# Altium PCB integrating_box_light_source.PcbDoc
Units mm, origin at the board's own origin, x right, y up, seen from the top; angles counter-clockwise.
Board outline 152.4 x 101.6 mm, 18 copper layers (F.Cu, F.Mask, B.Cu, B.Mask, F.SilkS, B.SilkS, F.Adhes, B.Adhes, F.Paste, B.Paste, Dwgs.User, Cmts.User, Eco1.User, Eco2.User, Edge.Cuts, Margin, B.CrtYd, F.CrtYd); 78 components, 0 nets, 246 pads, 0 vias.
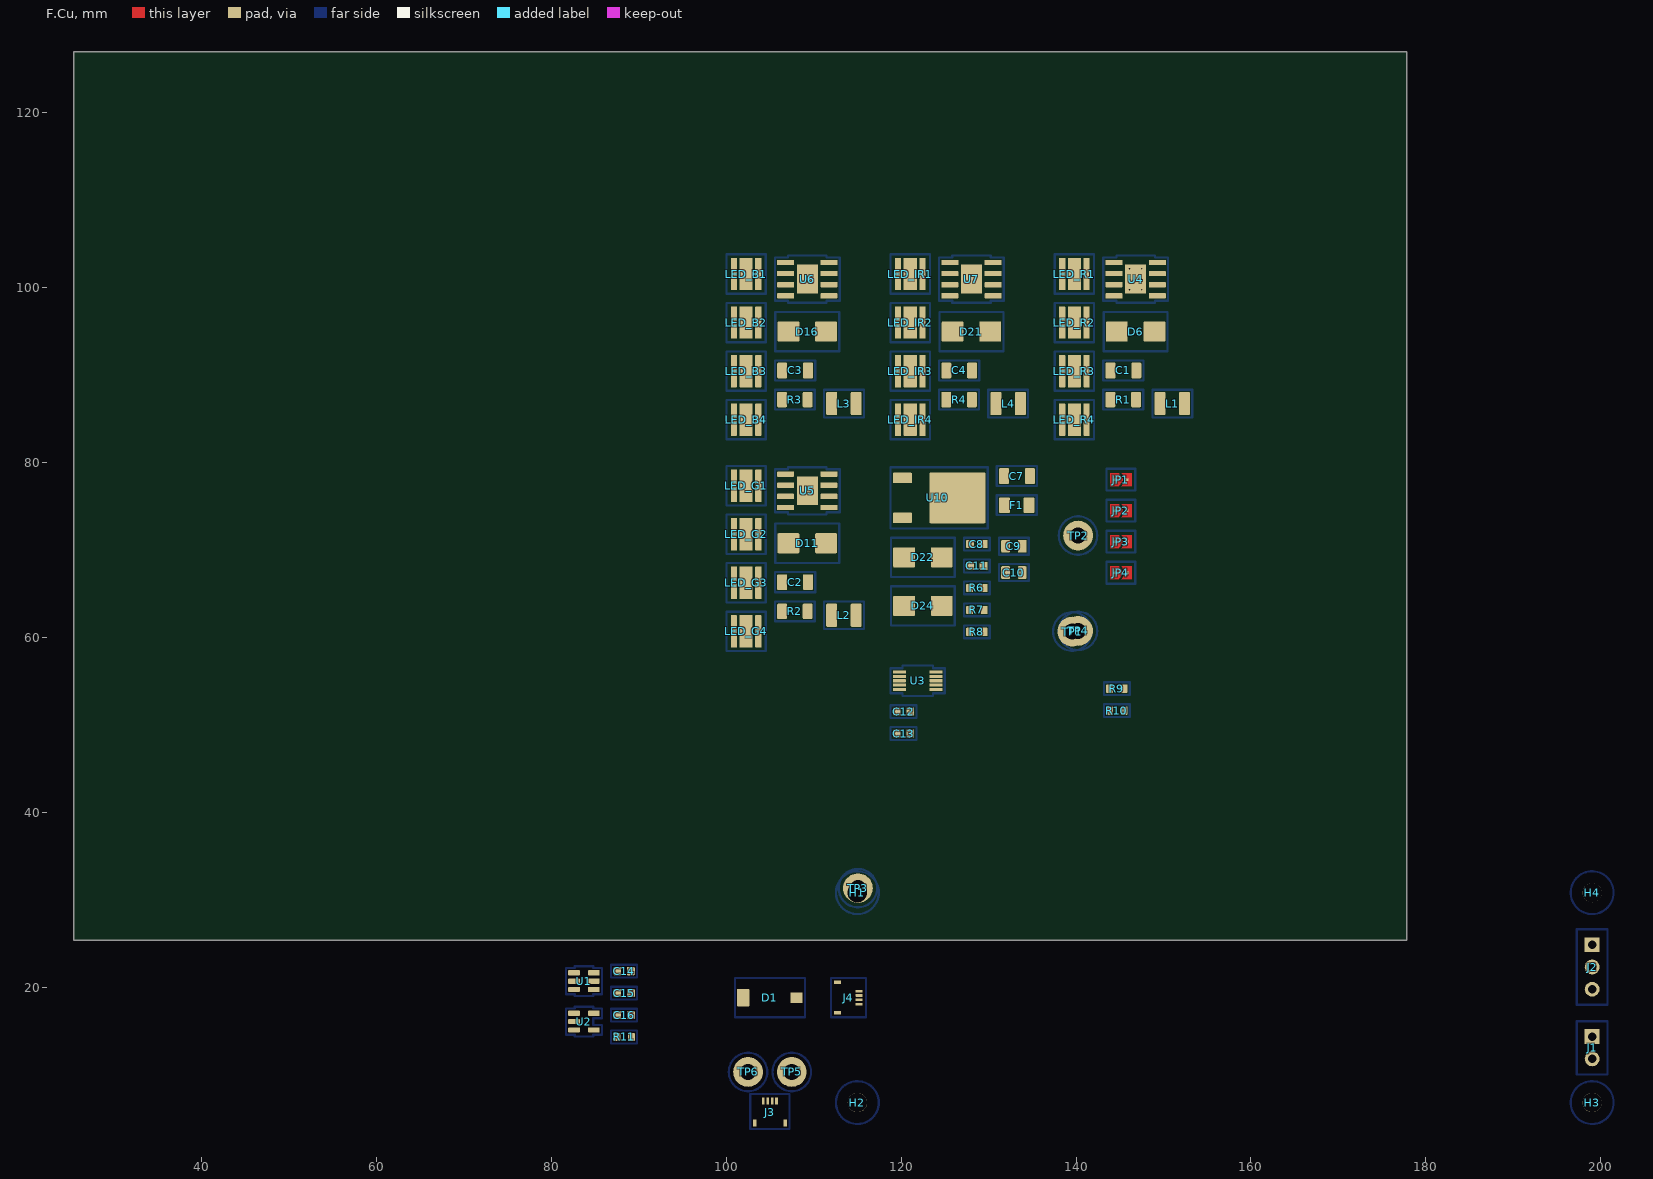
[diagram p0: F.Cu view]
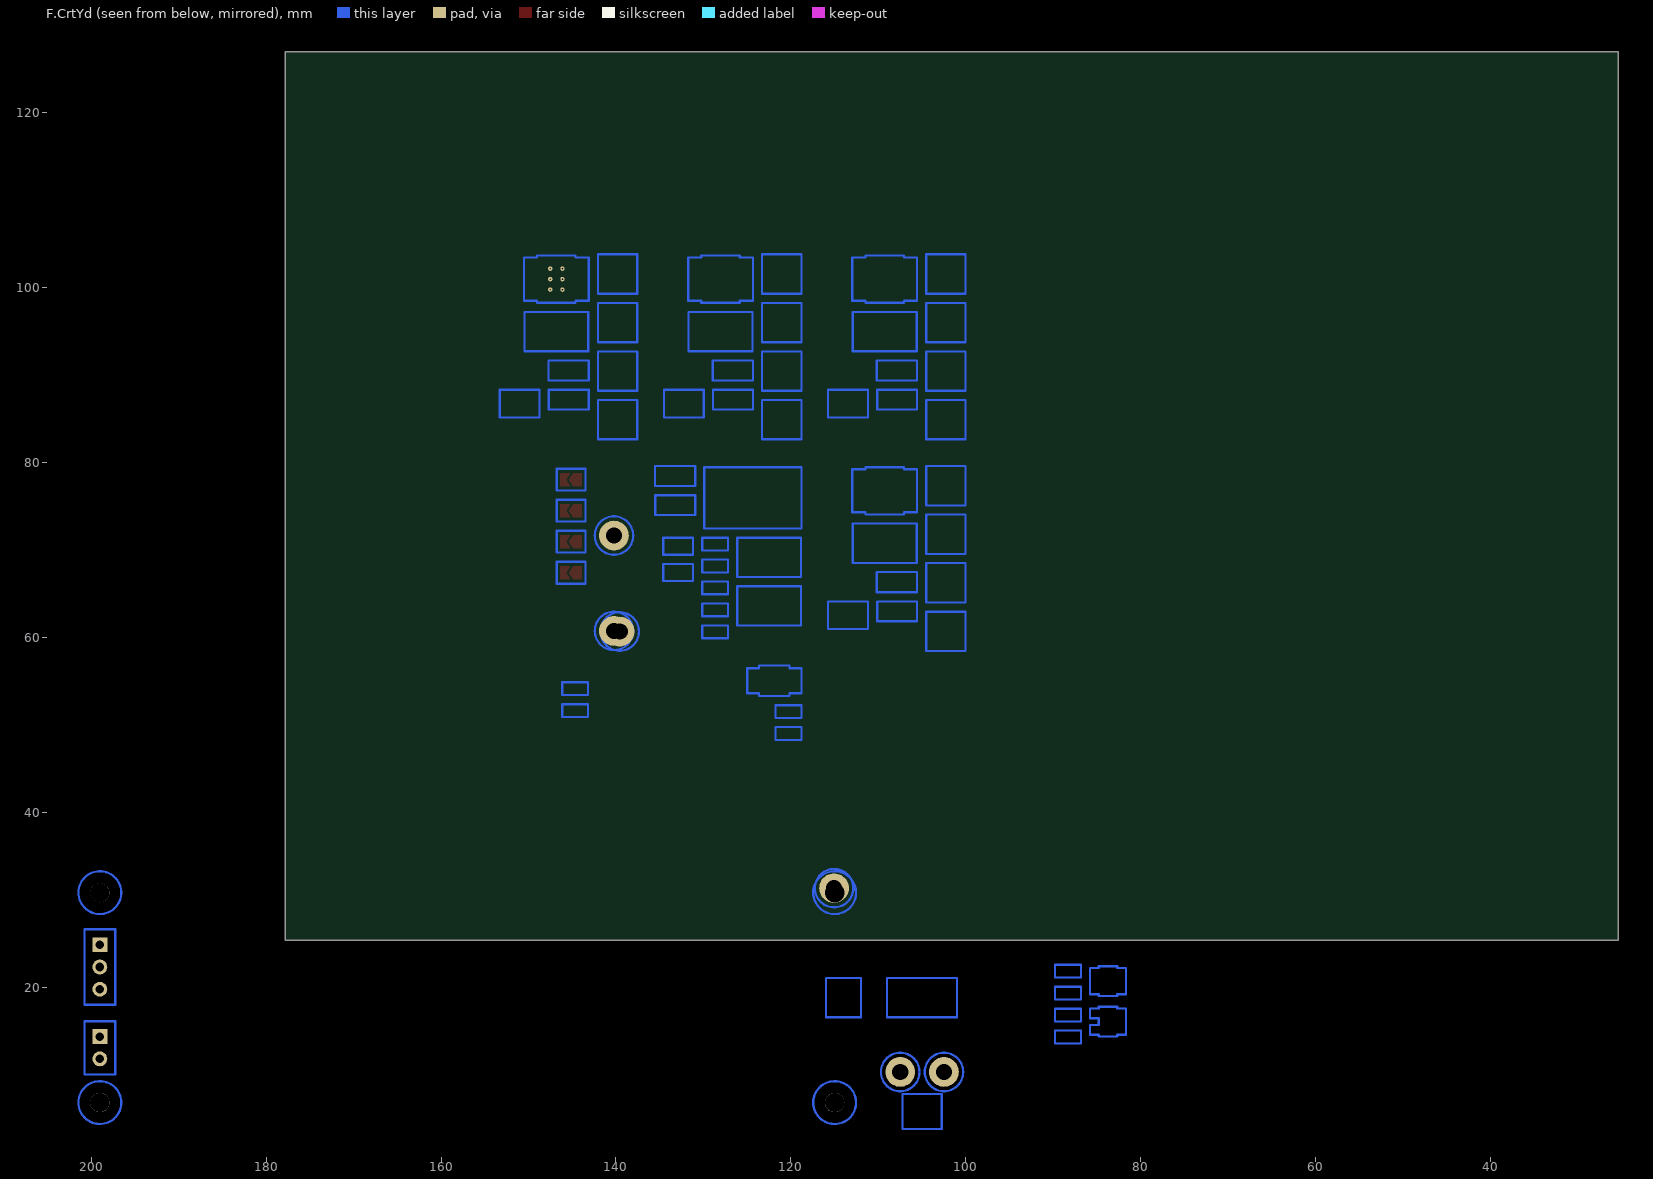
[diagram p1: F.CrtYd view, seen from below]
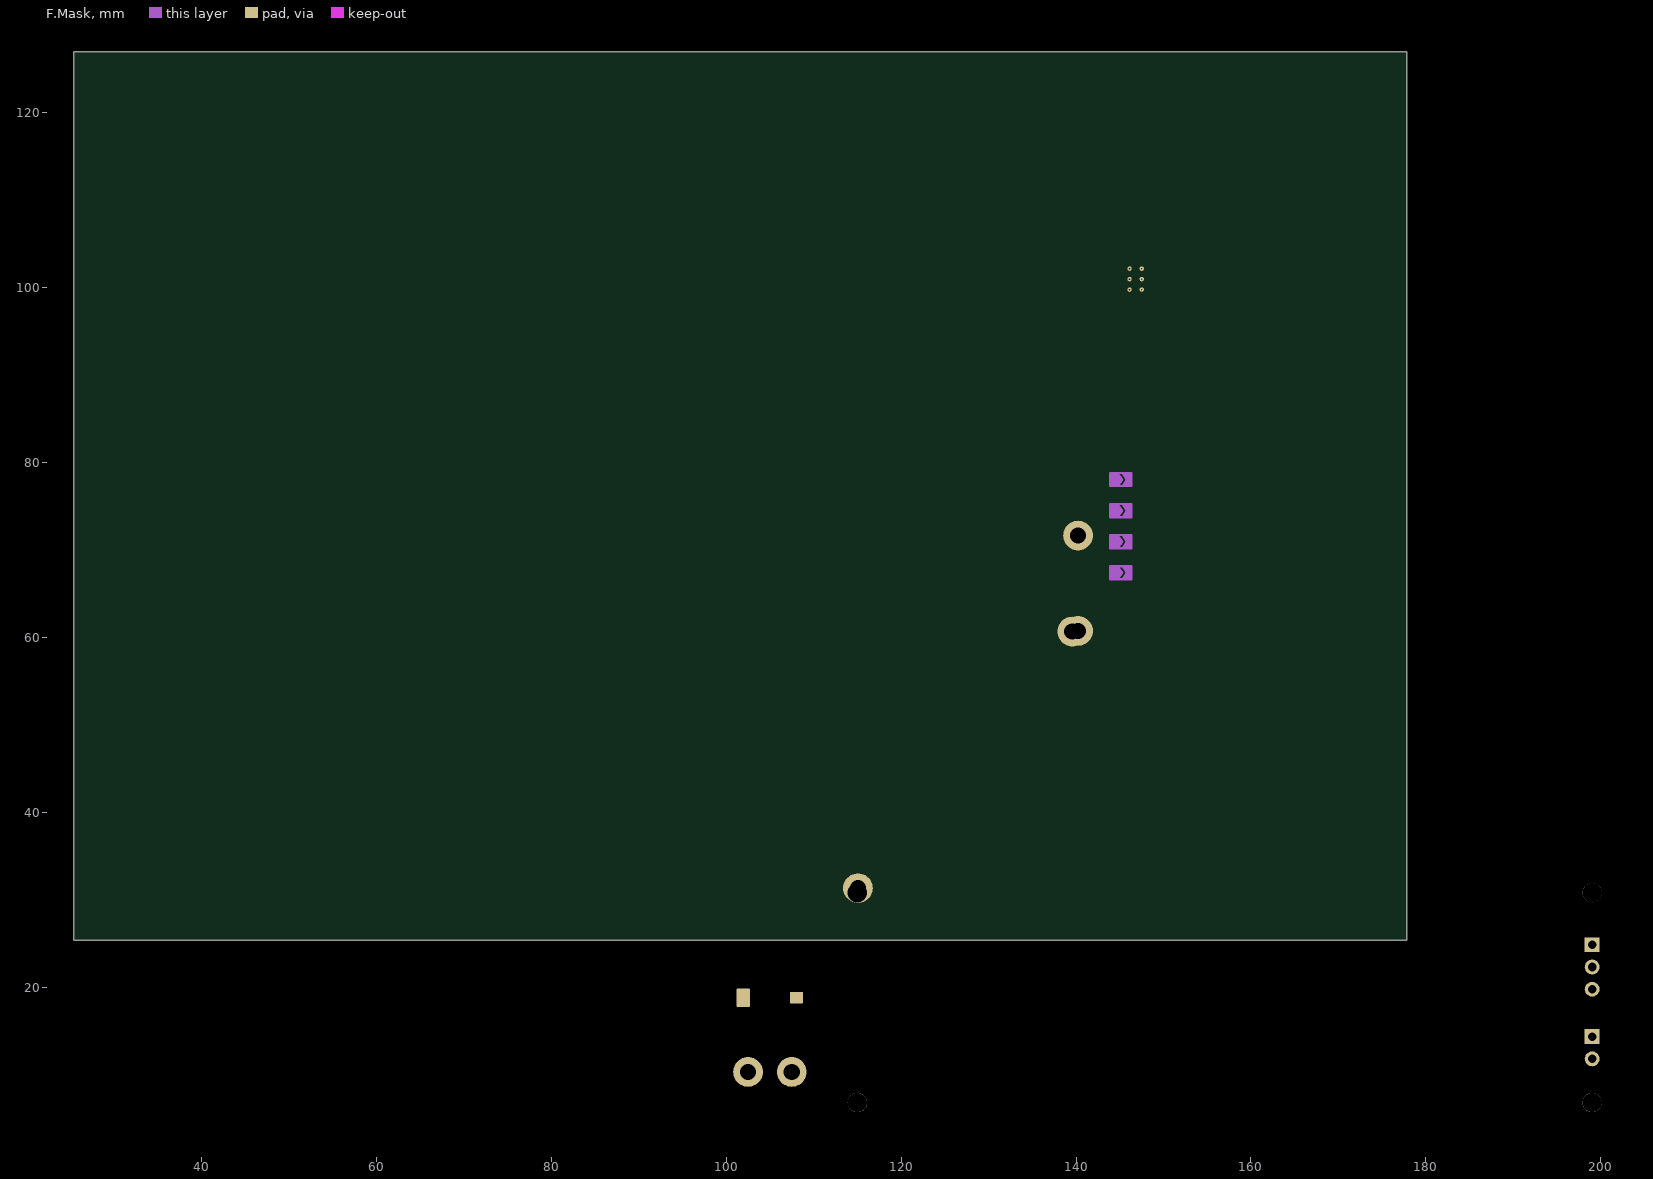
[diagram p2: F.Mask]
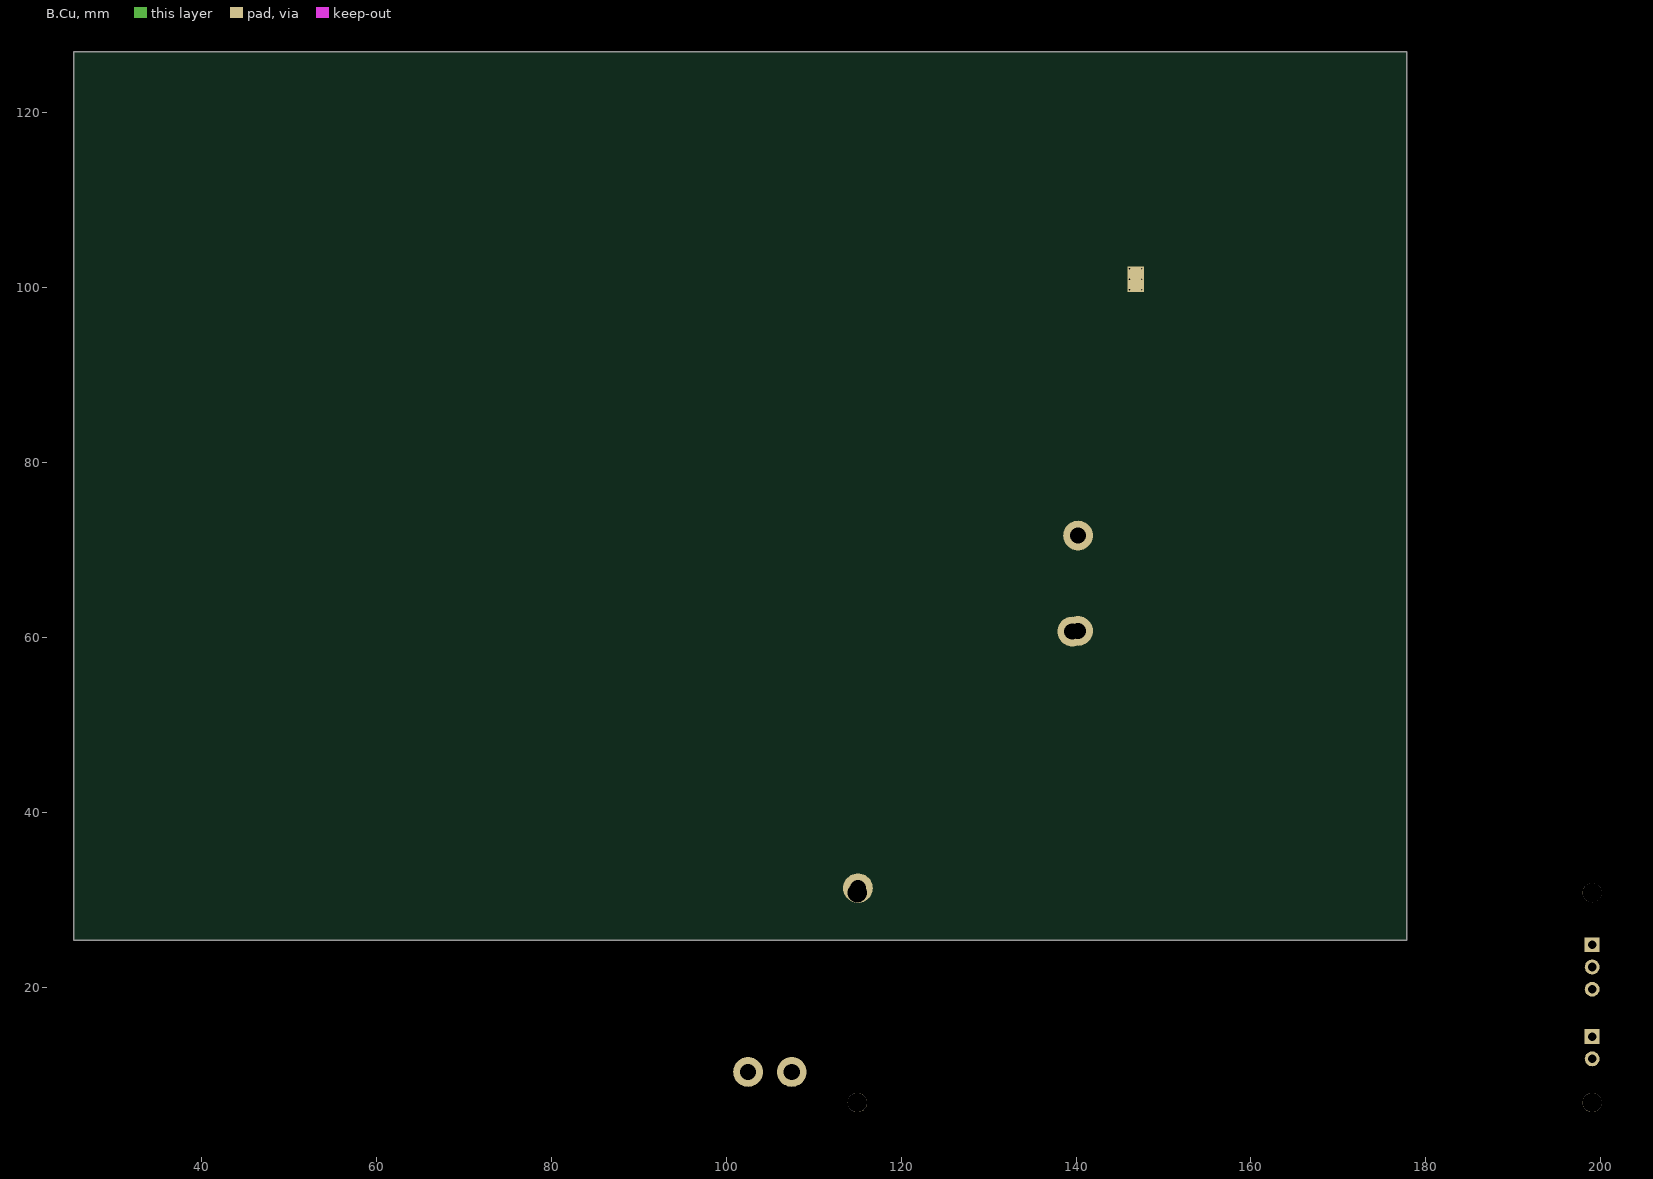
[diagram p3: B.Cu]
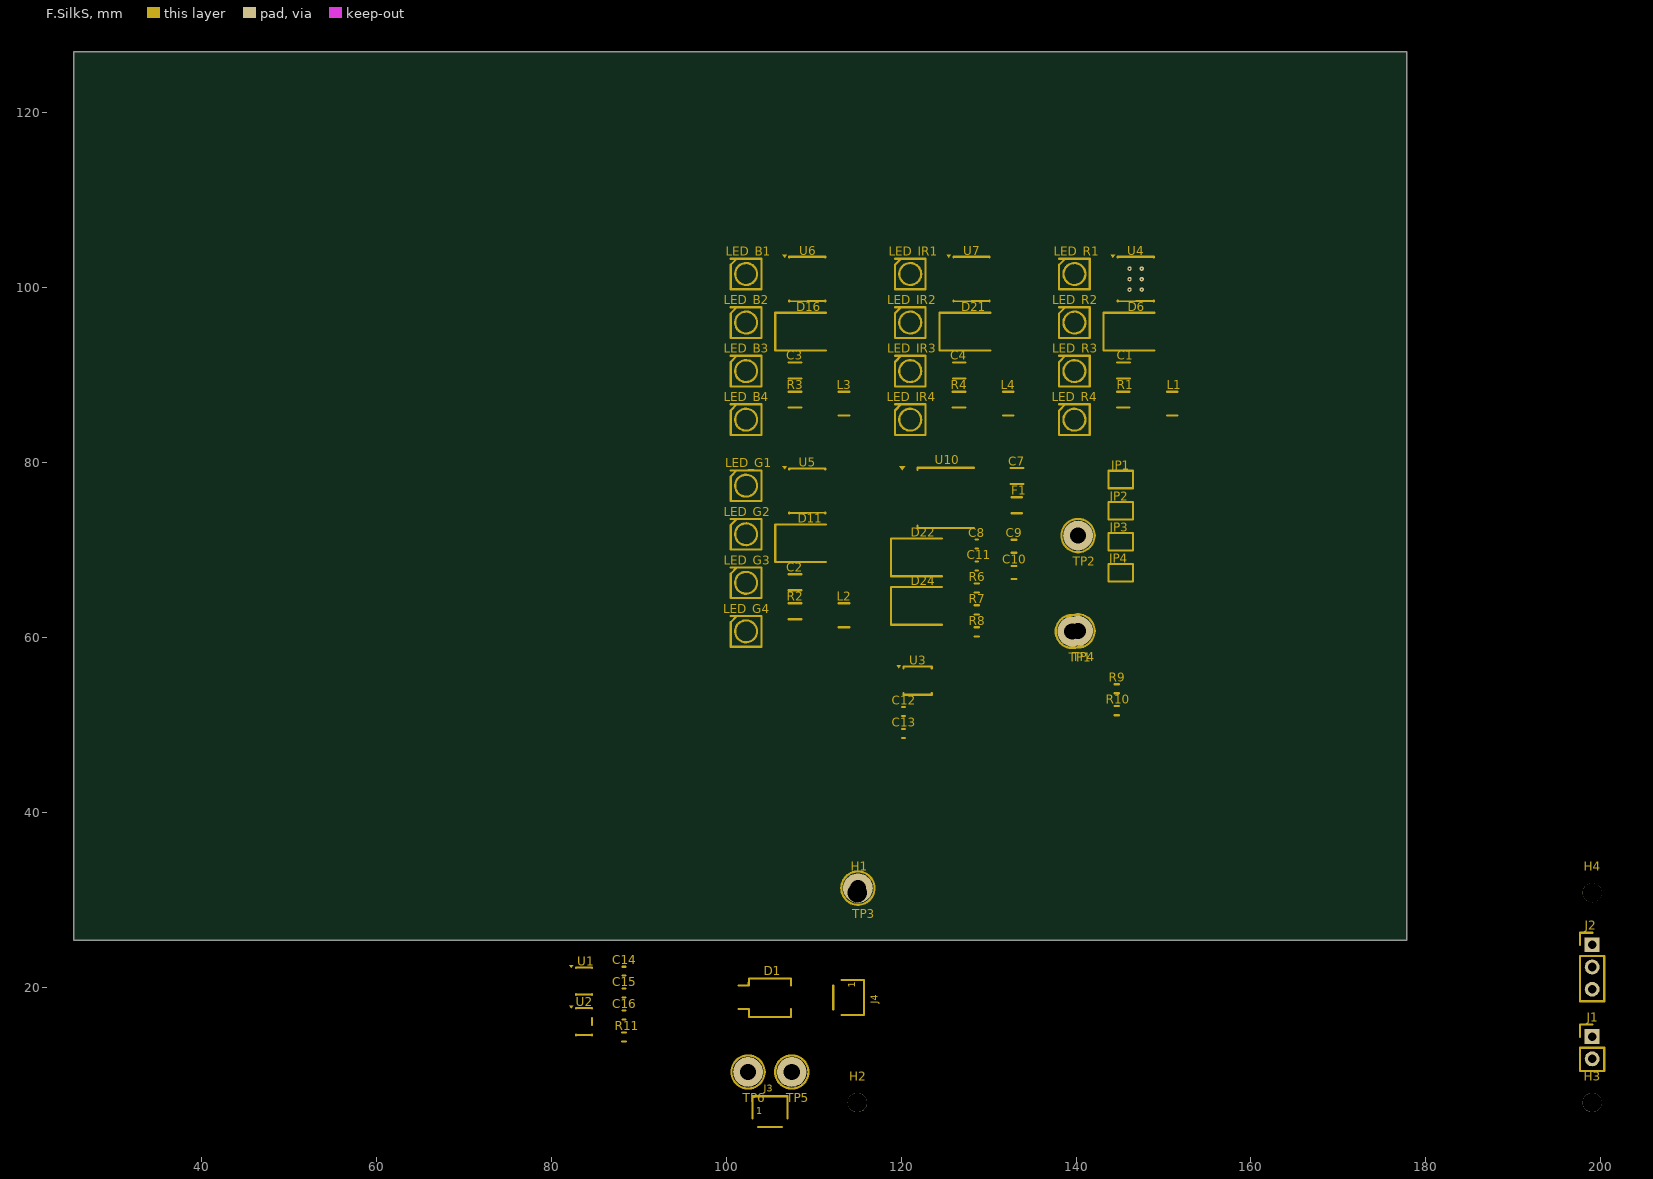
[diagram p4: F.SilkS]
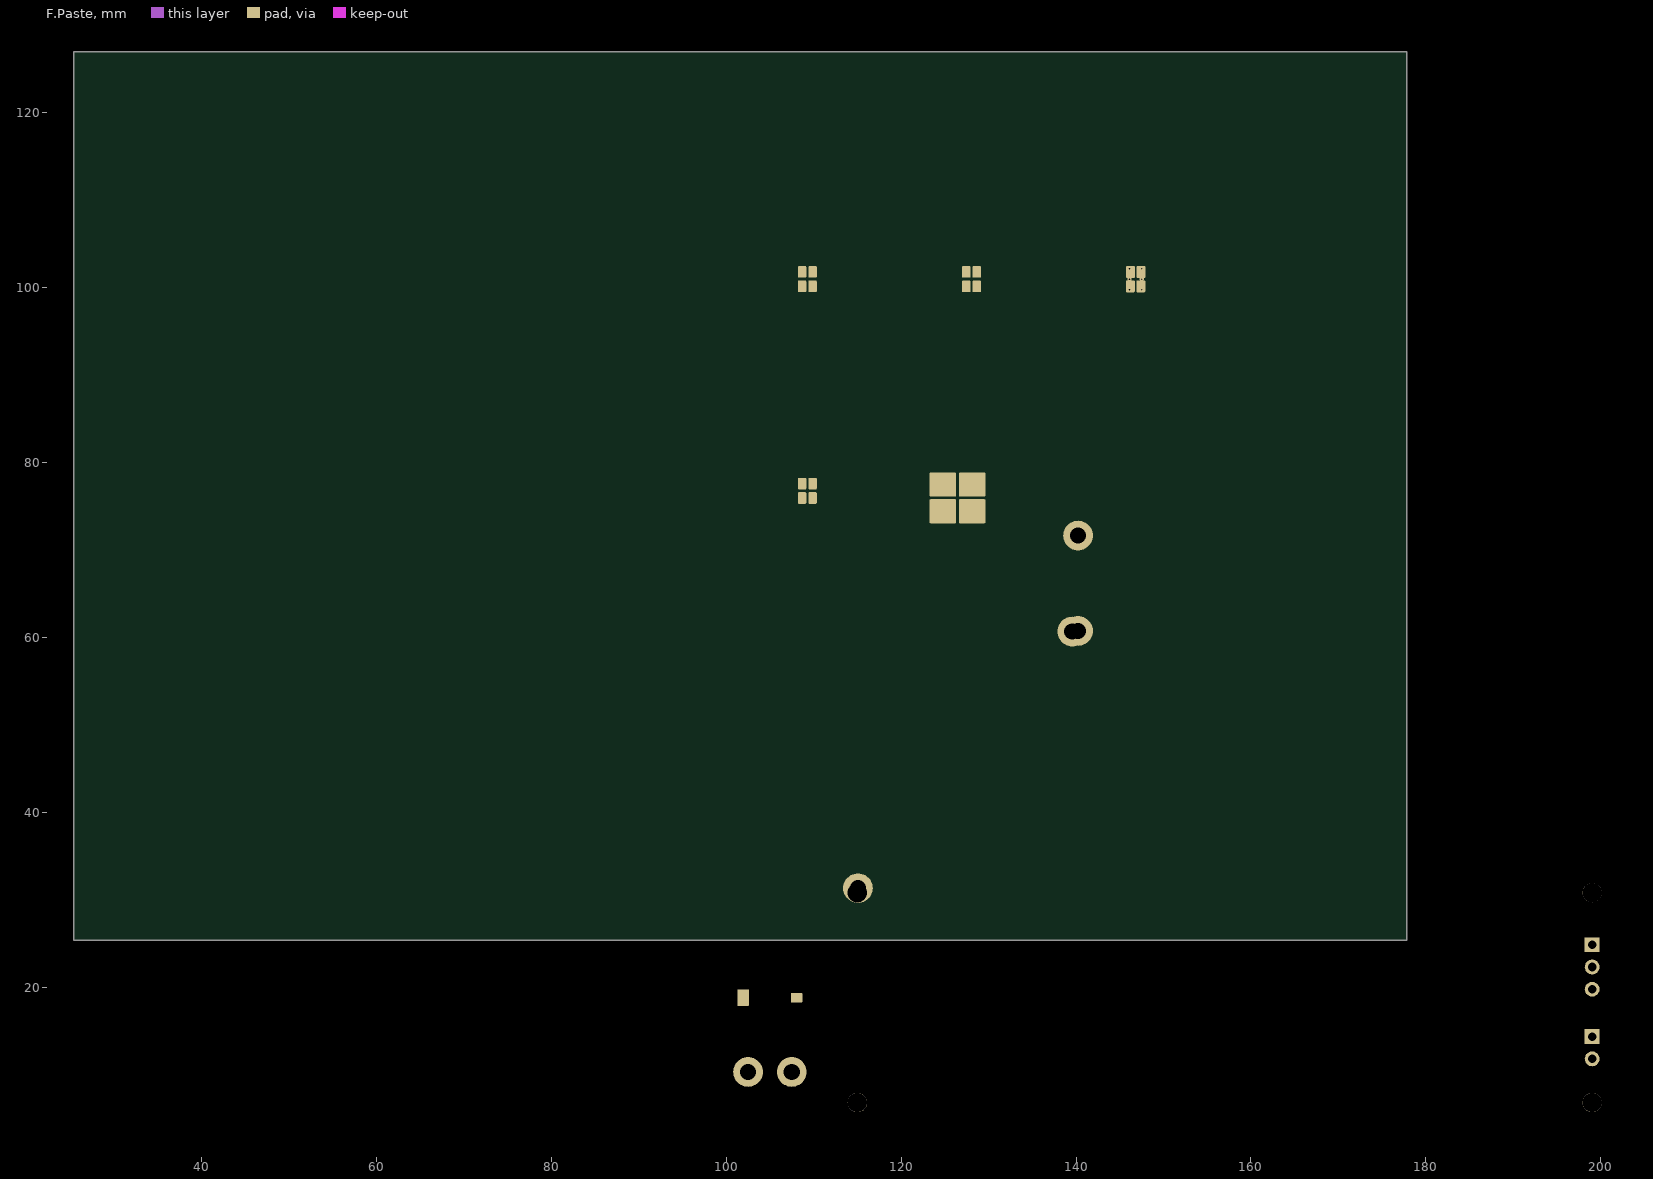
[diagram p5: F.Paste]
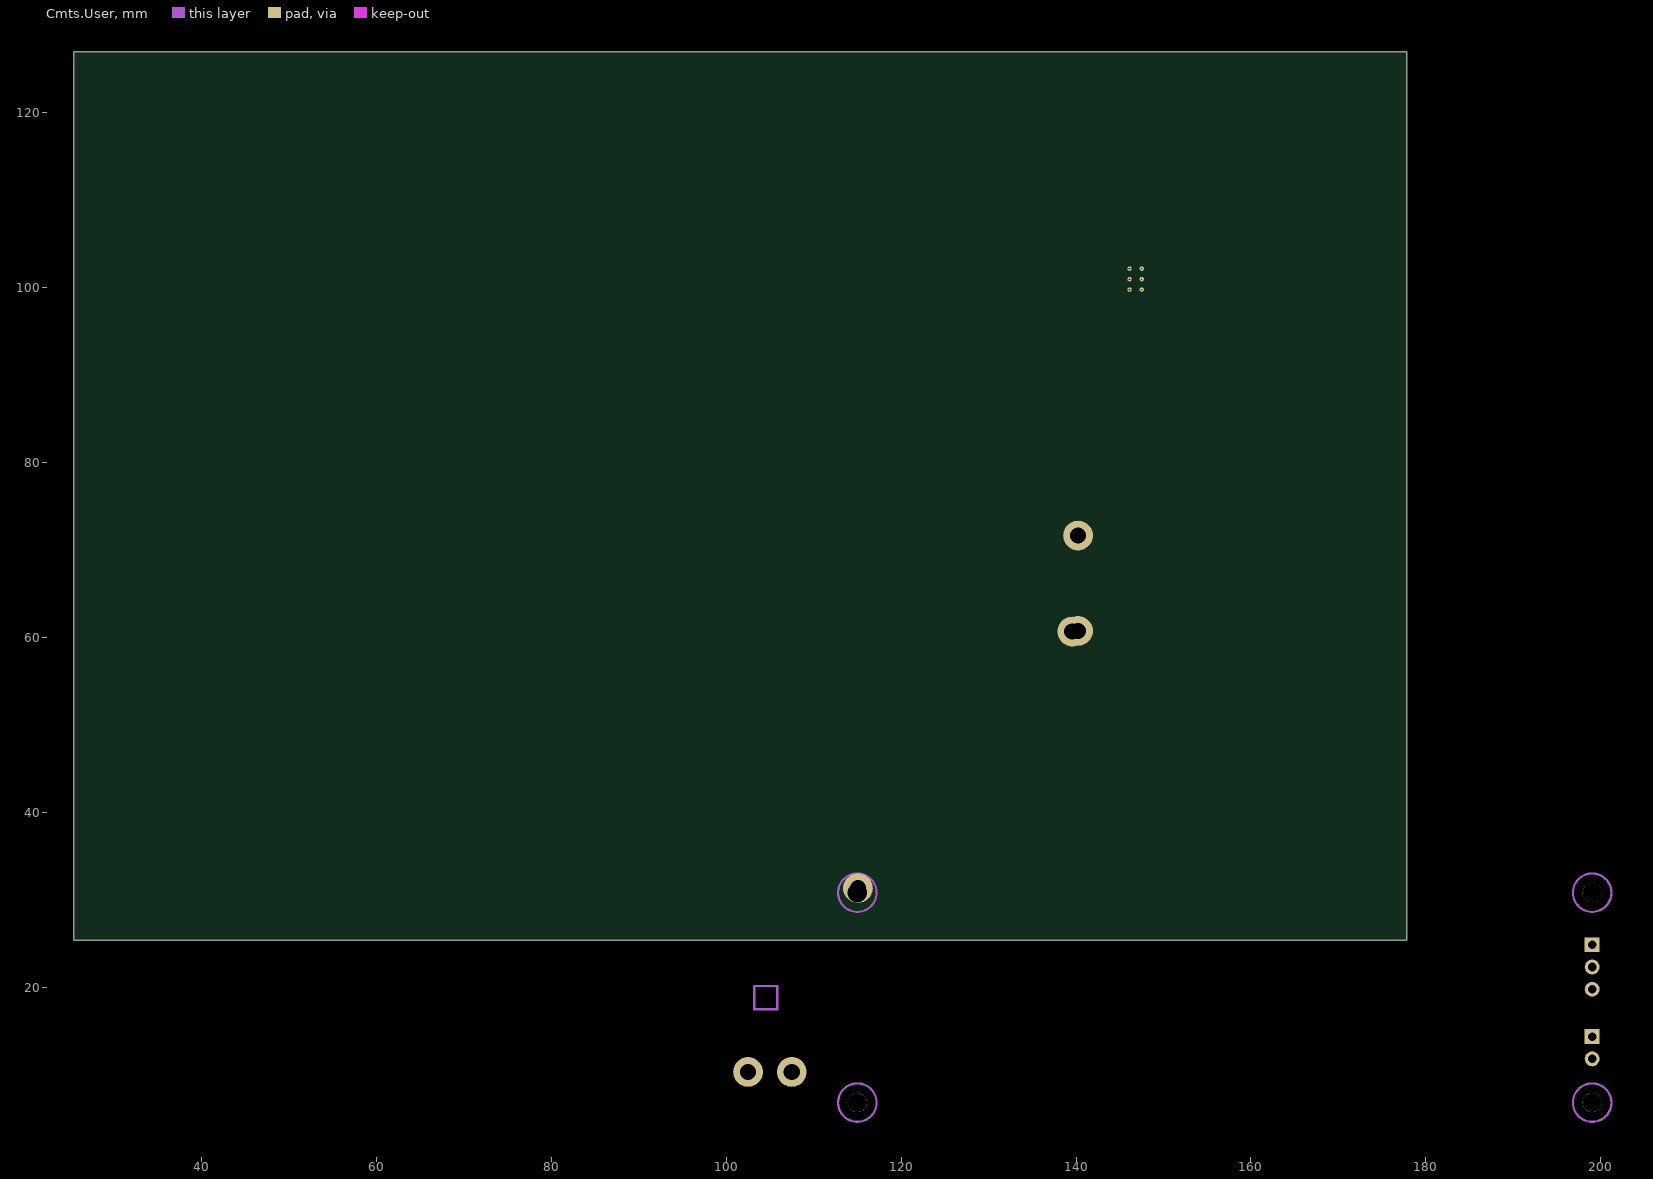
[diagram p6: Cmts.User]
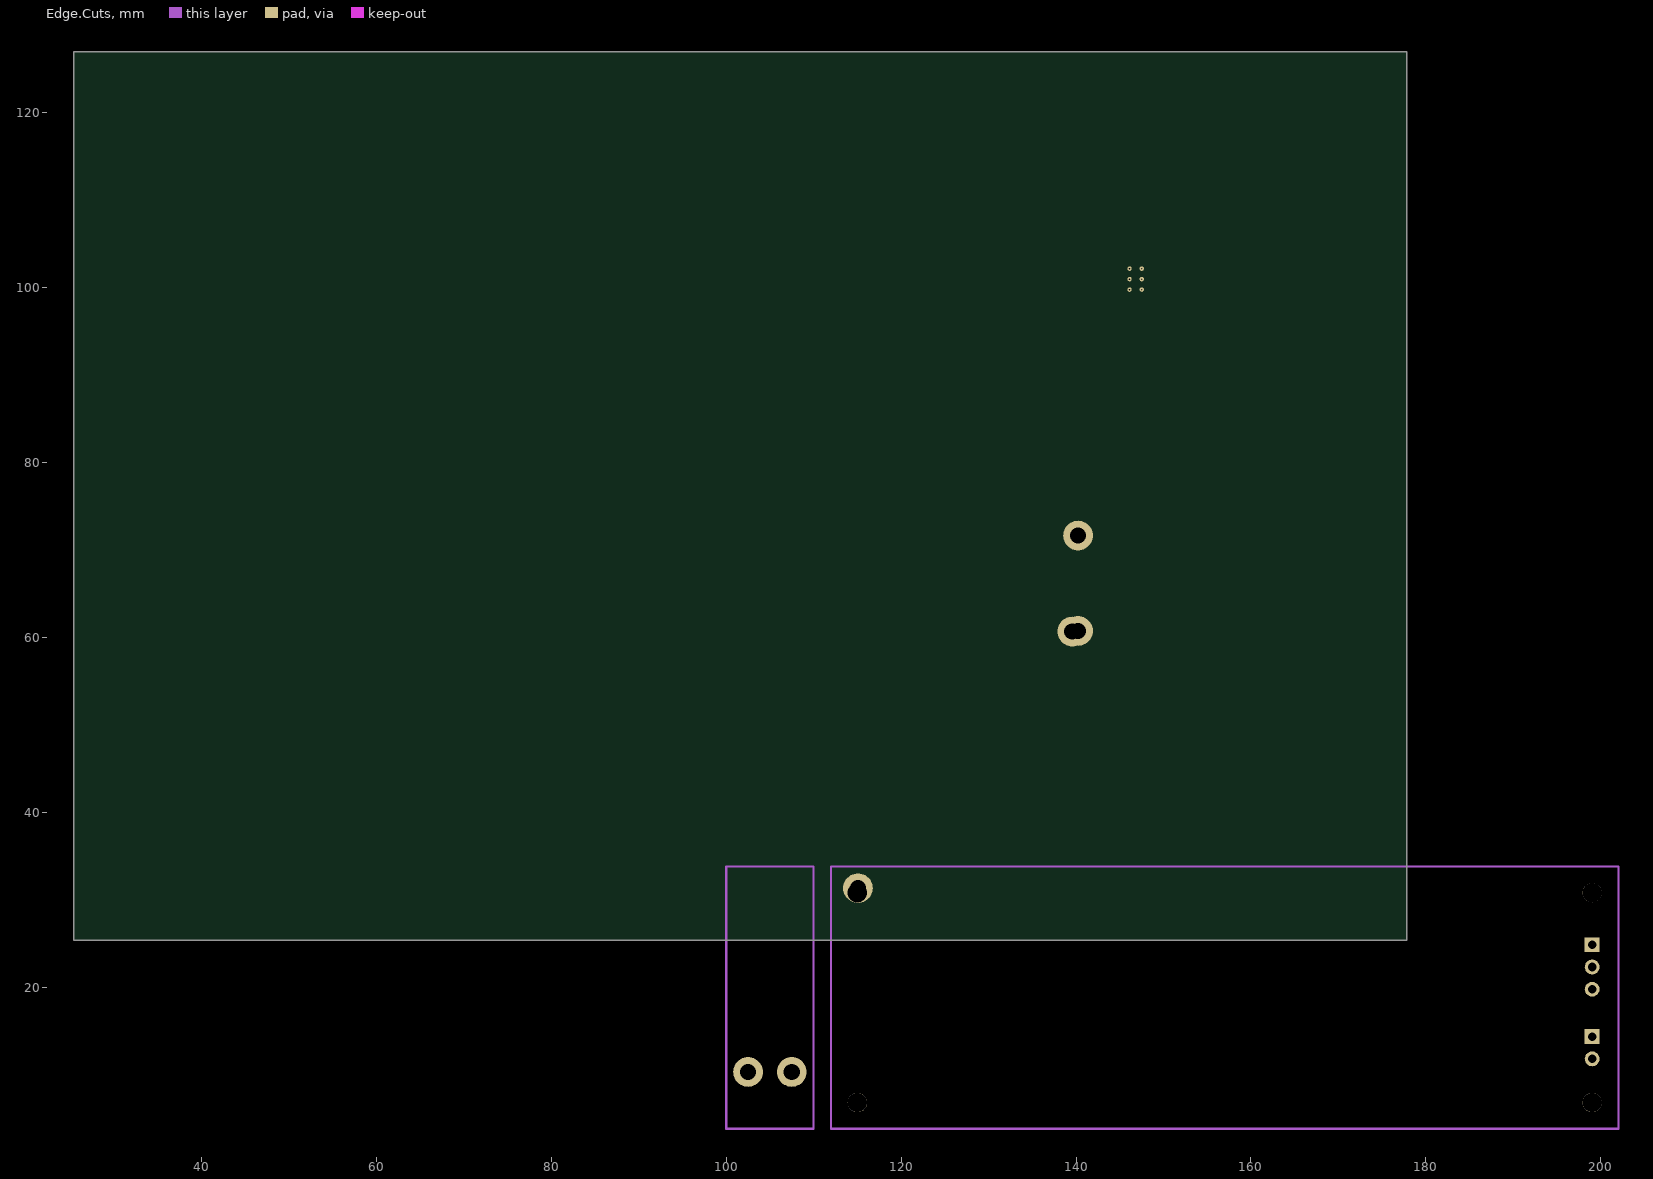
[diagram p7: Edge.Cuts]

## Layer stack, top to bottom
Top Solder: solder mask 0.0102, Solder Resist, Dk 3.5
F.Cu: signal copper 0.0356
Dielectric 1: dielectric 0.32, FR-4, Dk 4.8
F.Mask: signal copper 0.0356
Dielectric2: dielectric 0.32, FR-4, Dk 4.8
B.Cu: signal copper 0.0356
Dielectric3: dielectric 0.32, FR-4, Dk 4.8
B.Mask: signal copper 0.0356
Dielectric4: dielectric 0.32, FR-4, Dk 4.8
F.SilkS: signal copper 0.0356
Dielectric5: dielectric 0.32, FR-4, Dk 4.8
B.SilkS: signal copper 0.0356
Dielectric6: dielectric 0.32, FR-4, Dk 4.8
F.Adhes: signal copper 0.0356
Dielectric7: dielectric 0.32, FR-4, Dk 4.8
B.Adhes: signal copper 0.0356
Dielectric8: dielectric 0.32, FR-4, Dk 4.8
F.Paste: signal copper 0.0356
Dielectric9: dielectric 0.32, FR-4, Dk 4.8
B.Paste: signal copper 0.0356
Dielectric10: dielectric 0.32, FR-4, Dk 4.8
Dwgs.User: signal copper 0.0356
Dielectric11: dielectric 0.32, FR-4, Dk 4.8
Cmts.User: signal copper 0.0356
Dielectric12: dielectric 0.32, FR-4, Dk 4.8
Eco1.User: signal copper 0.0356
Dielectric13: dielectric 0.32, FR-4, Dk 4.8
Eco2.User: signal copper 0.0356
Dielectric14: dielectric 0.32, FR-4, Dk 4.8
Edge.Cuts: signal copper 0.0356
Dielectric15: dielectric 0.32, FR-4, Dk 4.8
Margin: signal copper 0.0356
Dielectric16: dielectric 0.32, FR-4, Dk 4.8
B.CrtYd: signal copper 0.0356
Dielectric17: dielectric 0.32, FR-4, Dk 4.8
F.CrtYd: signal copper 0.0356
Bottom Solder: solder mask 0.0102, Solder Resist, Dk 3.5

## Board outline
25.4,25.4 177.8,25.4 177.8,127 25.4,127

## Design rules (kind name [scope] priority, off if disabled: settings)
Clearance [All] p1: gap=0.254 ignorepadtopadclearanceinfootprint=FALSE
MinimumSolderMaskSliver [All] p1: minsoldermaskwidth=0
PolygonConnect [All] p1: connectstyle=Direct reliefconductorwidth=0.254 reliefentries=4 polygonreliefangle="90 Angle" airgapwidth=0.254
RoutingVias [All] p1: holewidth=0.711 width=1.27 viastyle="Through Hole" minholewidth=0.711 minwidth=1.27 maxholewidth=0.711 maxwidth=1.27
SilkToSilkClearance [All] p1: silktosilkclearance=0
SilkToSolderMaskClearance [IsPad] p1: minsilkscreentomaskgap=0 clearancetoexposedcopper=TRUE
SolderMaskExpansion [All] p1: expansion=0.102 istentingtop=FALSE
Width [All] p1: maxlimit=10 minlimit=0.254 preferedwidth=0.254 toplayer_maxwidth=0.254 midlayer2_maxwidth=0.254 midlayer3_maxwidth=0.254 midlayer7_maxwidth=0.254 midlayer9_maxwidth=0.254 midlayer11_maxwidth=0.254 midlayer13_maxwidth=0.254 midlayer15_maxwidth=0.254 midlayer17_maxwidth=0.254 midlayer21_maxwidth=0.254 midlayer23_maxwidth=0.254 midlayer27_maxwidth=0.254 midlayer29_maxwidth=0.254 minimp=50.000000 maximp=50.000000 favimp=50.000000
27 further rules are at their usual default settings.

## Components (designator, comment, footprint, x,y, rotation, side; value= is the part's Value field where it differs from the comment)
C1 "Comment" C_1206_3216Metric 145.415,90.545 r0 top value=10u/50V
C2 "Comment" C_1206_3216Metric 107.875,66.345 r0 top value=10u/50V
C3 "Comment" C_1206_3216Metric 107.875,90.545 r0 top value=10u/50V
C4 "Comment" C_1206_3216Metric 126.645,90.545 r0 top value=10u/50V
C7 "Comment" C_1206_3216Metric 133.245,78.475 r0 top value=10u/50V
C8 "Comment" C_0603_1608Metric 128.665,70.705 r0 top value=100n
C9 "Comment" C_0805_2012Metric 132.895,70.455 r0 top value=1u/50V
C10 "Comment" C_0805_2012Metric 132.895,67.445 r0 top value=10u/16V
C11 "Comment" C_0603_1608Metric 128.665,68.195 r0 top value=100n
C12 "Comment" C_0603_1608Metric 120.275,51.555 r0 top value=100n
C13 "Comment" C_0603_1608Metric 120.275,49.045 r0 top value=1u
C14 "Comment" C_0603_1608Metric 88.325,21.88 r0 top value=10p
C15 "Comment" C_0603_1608Metric 88.325,19.37 r0 top value=100n
C16 "Comment" C_0603_1608Metric 88.325,16.86 r0 top value=100n
D1 "Comment" Osram_BPW34S-SMD 105,18.85 r0 top value=BPW34S-SMD
D6 "Comment" D_SMB 146.81,94.995 r0 top value=SS34
D11 "Comment" D_SMB 109.27,70.795 r0 top value=SS34
D16 "Comment" D_SMB 109.27,94.995 r0 top value=SS34
D21 "Comment" D_SMB 128.04,94.995 r0 top value=SS34
D22 "Comment" D_SMB 122.49,69.185 r0 top value=SMBJ30CA
D24 "Comment" D_SMB 122.49,63.635 r0 top value=SS54
F1 "Comment" Fuse_1206_3216Metric 133.225,75.145 r0 top value=2A/125V
H1 "Comment" MountingHole_2.2mm_M2 115,30.85 r0 top value=MountingHole
H2 "Comment" MountingHole_2.2mm_M2 115,6.85 r0 top value=MountingHole
H3 "Comment" MountingHole_2.2mm_M2 199,6.85 r0 top value=MountingHole
H4 "Comment" MountingHole_2.2mm_M2 199,30.85 r0 top value=MountingHole
J1 "Comment" PinHeader_1x02_P2.54mm_Vertical 199,14.39 r0 top value=Conn_01x02_焊线焊盘
J2 "Comment" PinHeader_1x03_P2.54mm_Vertical 199,24.89 r0 top value=Conn_01x03_焊线焊盘
J3 "Comment" HC-FPC-05-09-4RLTAG 105,7.025 r0 top value=FPC_0.5mm_4P_卧贴
J4 "Comment" HC-FPC-05-09-4RLTAG 115.2,18.85 r270 top value=FPC_0.5mm_4P_卧贴
JP1 "Comment" SolderJumper-2_P1.3mm_Open_TrianglePad1.0x1.5mm 145.125,78.075 r0 top value=SolderJumper_2_Open
JP2 "Comment" SolderJumper-2_P1.3mm_Open_TrianglePad1.0x1.5mm 145.125,74.525 r0 top value=SolderJumper_2_Open
JP3 "Comment" SolderJumper-2_P1.3mm_Open_TrianglePad1.0x1.5mm 145.125,70.975 r0 top value=SolderJumper_2_Open
JP4 "Comment" SolderJumper-2_P1.3mm_Open_TrianglePad1.0x1.5mm 145.125,67.425 r0 top value=SolderJumper_2_Open
L1 "Comment" L_1210_3225Metric 151.005,86.765 r0 top value=100uH
L2 "Comment" L_1210_3225Metric 113.465,62.565 r0 top value=100uH
L3 "Comment" L_1210_3225Metric 113.465,86.765 r0 top value=100uH
L4 "Comment" L_1210_3225Metric 132.235,86.765 r0 top value=100uH
LED_B1 "Comment" LED_3535_3500x3500mm 102.275,101.575 r0 top value=XL-HD3535UBC-A2
LED_B2 "Comment" LED_3535_3500x3500mm 102.275,96.025 r0 top value=XL-HD3535UBC-A2
LED_B3 "Comment" LED_3535_3500x3500mm 102.275,90.475 r0 top value=XL-HD3535UBC-A2
LED_B4 "Comment" LED_3535_3500x3500mm 102.275,84.925 r0 top value=XL-HD3535UBC-A2
LED_G1 "Comment" LED_3535_3500x3500mm 102.275,77.375 r0 top value=JNJ-LEHG0113W120
LED_G2 "Comment" LED_3535_3500x3500mm 102.275,71.825 r0 top value=JNJ-LEHG0113W120
LED_G3 "Comment" LED_3535_3500x3500mm 102.275,66.275 r0 top value=JNJ-LEHG0113W120
LED_G4 "Comment" LED_3535_3500x3500mm 102.275,60.725 r0 top value=JNJ-LEHG0113W120
LED_IR1 "Comment" LED_3535_3500x3500mm 121.045,101.575 r0 top value=XL-HD3535HIR-T4A2
LED_IR2 "Comment" LED_3535_3500x3500mm 121.045,96.025 r0 top value=XL-HD3535HIR-T4A2
LED_IR3 "Comment" LED_3535_3500x3500mm 121.045,90.475 r0 top value=XL-HD3535HIR-T4A2
LED_IR4 "Comment" LED_3535_3500x3500mm 121.045,84.925 r0 top value=XL-HD3535HIR-T4A2
LED_R1 "Comment" LED_3535_3500x3500mm 139.815,101.575 r0 top value=XL-HD3535SURC-A2
LED_R2 "Comment" LED_3535_3500x3500mm 139.815,96.025 r0 top value=XL-HD3535SURC-A2
LED_R3 "Comment" LED_3535_3500x3500mm 139.815,90.475 r0 top value=XL-HD3535SURC-A2
LED_R4 "Comment" LED_3535_3500x3500mm 139.815,84.925 r0 top value=XL-HD3535SURC-A2
R1 "Comment" R_1206_3216Metric 145.395,87.215 r0 top value=R30
R2 "Comment" R_1206_3216Metric 107.855,63.015 r0 top value=R30
R3 "Comment" R_1206_3216Metric 107.855,87.215 r0 top value=R30
R4 "Comment" R_1206_3216Metric 126.625,87.215 r0 top value=R30
R6 "Comment" R_0603_1608Metric 128.665,65.685 r0 top value=240
R7 "Comment" R_0603_1608Metric 128.665,63.175 r0 top value=390
R8 "Comment" R_0603_1608Metric 128.665,60.665 r0 top value=470
R9 "Comment" R_0603_1608Metric 144.665,54.165 r0 top value=4k7
R10 "Comment" R_0603_1608Metric 144.665,51.655 r0 top value=4k7
R11 "Comment" R_0603_1608Metric 88.325,14.35 r0 top value=47k
TP1 "Comment" TestPoint_Loop_D2.50mm_Drill1.85mm 139.573,60.706 r0 top value=TestPoint
TP2 "Comment" TestPoint_Loop_D2.50mm_Drill1.85mm 140.225,71.675 r0 top value=TestPoint
TP3 "Comment" TestPoint_Loop_D2.50mm_Drill1.85mm 115.062,31.369 r0 top value=TestPoint
TP4 "Comment" TestPoint_Loop_D2.50mm_Drill1.85mm 140.225,60.775 r0 top value=TestPoint
TP5 "Comment" TestPoint_Loop_D2.50mm_Drill1.85mm 107.5,10.35 r0 top value=TestPoint
TP6 "Comment" TestPoint_Loop_D2.50mm_Drill1.85mm 102.5,10.35 r0 top value=TestPoint
U1 "Comment" SOT-23-6 83.745,20.735 r0 top value=ADS1110
U2 "Comment" SOT-23-5 83.745,16.11 r0 top value=OPA333xxDBV
U3 "Comment" MSOP-10_3x3mm_P0.5mm 121.895,55.08 r0 top value=MCP4728
U4 "Comment" SOIC-8-1EP_3.9x4.9mm_P1.27mm_EP2.41x3.3mm_ThermalVias 146.815,100.99 r0 top value=AL8862SP-13
U5 "Comment" SOIC-8-1EP_3.9x4.9mm_P1.27mm_EP2.41x3.3mm 109.275,76.79 r0 top value=AL8862SP-13
U6 "Comment" SOIC-8-1EP_3.9x4.9mm_P1.27mm_EP2.41x3.3mm 109.275,100.99 r0 top value=AL8862SP-13
U7 "Comment" SOIC-8-1EP_3.9x4.9mm_P1.27mm_EP2.41x3.3mm 128.045,100.99 r0 top value=AL8862SP-13
U10 "Comment" TO-252-2 125.185,75.98 r0 top value=LM317

## Footprints (in the part's own frame and the unit in brackets; to place one, negate y for a bottom-side part, rotate by r counter-clockwise, add the part's x,y. Pads: shape width x height; smd on the part's side, far side on the other; paste and mask are expansions set on the pad)
C_0603_1608Metric [mm]
  rrect25% 0.9x0.95 smd paste-0.95 mask-0.95: 1(-0.775,0) 2(0.775,0)
  F.SilkS lines w0.254: -0.141,-0.51 0.141,-0.51 ; -0.141,0.51 0.141,0.51
  F.CrtYd lines w0.254: -1.48,-0.73 1.48,-0.73 1.48,0.73 -1.48,0.73 -1.48,-0.73
C_0805_2012Metric [mm]
  rrect25% 1x1.45 smd paste-1.45 mask-1.45: 1(-0.95,0) 2(0.95,0)
  F.SilkS lines w0.254: -0.261,-0.735 0.261,-0.735 ; -0.261,0.735 0.261,0.735
  F.CrtYd lines w0.254: -1.7,-0.98 1.7,-0.98 1.7,0.98 -1.7,0.98 -1.7,-0.98
C_1206_3216Metric [mm]
  rrect22% 1.15x1.8 smd paste-1.8 mask-1.8: 1(-1.475,0) 2(1.475,0)
  F.SilkS lines w0.254: -0.711,-0.91 0.711,-0.91 ; -0.711,0.91 0.711,0.91
  F.CrtYd lines w0.254: -2.3,-1.15 2.3,-1.15 2.3,1.15 -2.3,1.15 -2.3,-1.15
D_SMB [mm]
  rrect11% 2.5x2.3 smd paste-2.5 mask-2.5: 1(-2.15,0) 2(2.15,0)
  F.SilkS lines w0.254: 2.15,-2.15 -3.66,-2.15 -3.66,2.15 2.15,2.15
  F.CrtYd lines w0.254: -3.65,-2.25 3.65,-2.25 3.65,2.25 -3.65,2.25 -3.65,-2.25
Fuse_1206_3216Metric [mm]
  rrect20% 1.25x1.75 smd paste-1.75 mask-1.75: 1(-1.4,0) 2(1.4,0)
  F.SilkS lines w0.254: -0.602,-0.91 0.602,-0.91 ; -0.602,0.91 0.602,0.91
  F.CrtYd lines w0.254: -2.28,-1.13 2.28,-1.13 2.28,1.13 -2.28,1.13 -2.28,-1.13
HC-FPC-05-09-4RLTAG [mm]
  rrect25% 0.3x0.8 smd paste-0.8 mask-0.8: 1(-0.75,0) 2(-0.25,0) 3(0.25,0) 4(0.75,0)
  rect 0.4x0.8 smd paste-0.8 mask-0.8: 5(-1.75,-2.5) 6(1.75,-2.5)
  F.SilkS lines w0.254: -2,-2 -2,0.55 2,0.55 2,-2 ; -1.35,-2.95 1.35,-2.95
  F.CrtYd lines w0.254: -2.25,-3.2 2.25,-3.2 2.25,0.8 -2.25,0.8 -2.25,-3.2
L_1210_3225Metric [mm]
  rrect20% 1.25x2.65 smd paste-2.65 mask-2.65: 1(-1.4,0) 2(1.4,0)
  F.SilkS lines w0.254: -0.602,-1.36 0.602,-1.36 ; -0.602,1.36 0.602,1.36
  F.CrtYd lines w0.254: -2.28,-1.58 2.28,-1.58 2.28,1.58 -2.28,1.58 -2.28,-1.58
LED_3535_3500x3500mm [mm]
  rrect14% 0.7x3.7 smd paste-3.7 mask-3.7: 1(-1.4,0) 2(1.4,0)
  rrect7% 1.5x3.7 smd paste-3.7 mask-3.7: Un1(0,0)
  F.SilkS circle w0.254: c0,0 r1.25
  F.SilkS lines w0.254: -1.75,1.75 1.75,1.75 1.75,-1.75 -1.75,-1.75 -1.75,1.05 -1.05,1.75
  F.CrtYd lines w0.254: -2.25,-2.25 2.25,-2.25 2.25,2.25 -2.25,2.25 -2.25,-2.25
MountingHole_2.2mm_M2 [mm]
  round 2.2 hole 2.2 paste-2539.97 mask-2.2: Un1(0,0)
  Cmts.User circle w0.254: c0,0 r2.2
  F.CrtYd circle w0.254: c0,0 r2.45
MSOP-10_3x3mm_P0.5mm [mm]
  rrect25% 1.5x0.35 smd paste-1.5 mask-1.5: 1(-2.1,1) 2(-2.1,0.5) 3(-2.1,0) 4(-2.1,-0.5) 5(-2.1,-1) 6(2.1,-1) 7(2.1,-0.5) 8(2.1,0) 9(2.1,0.5) 10(2.1,1)
  F.SilkS region: -2.16,1.44 -2.4,1.77 -1.92,1.77
  F.SilkS lines w0.254: -1.61,-1.435 -1.61,-1.61 1.61,-1.61 1.61,-1.435 ; -1.61,1.435 -1.61,1.61 1.61,1.61 1.61,1.435
  F.CrtYd lines w0.254: -3.1,-1.43 -3.1,1.43 -1.75,1.43 -1.75,1.75 1.75,1.75 1.75,1.43 3.1,1.43 3.1,-1.43 1.75,-1.43 1.75,-1.75 -1.75,-1.75 -1.75,-1.43 -3.1,-1.43
Osram_BPW34S-SMD [mm]
  rrect12% 1.4x2 smd paste-2 mask-2: 1(-3.05,0)
  rrect12% 1.4x1.2 smd paste-1.4 mask-1.4: 2(3.05,0)
  rrect12% 1.3x1.9 on Mid13 paste-1.9 mask-1.9: Un1(-3.05,0)
  rrect12% 1.5x2.1 on Mid1 paste-2.1 mask-2.1: Un2(-3.05,0)
  rrect12% 1.3x1.1 on Mid13 paste-1.3 mask-1.3: Un3(3.05,0)
  rrect12% 1.5x1.3 on Mid1 paste-1.5 mask-1.5: Un4(3.05,0)
  F.SilkS lines w0.254: -3.59,-1.31 -2.4,-1.31 -2.4,-2.2 2.4,-2.2 2.4,-1.31 ; -3.59,1.4 -2.41,1.4 -2.4,2.2 2.4,2.2 2.4,1.4
  Cmts.User lines w0.254: -1.8,-1.325 0.85,-1.325 0.85,1.325 -1.8,1.325 -1.8,-1.325
  F.CrtYd lines w0.254: -4,-2.25 4,-2.25 4,2.25 -4,2.25 -4,-2.25
PinHeader_1x02_P2.54mm_Vertical [mm]
  rect 1.7x1.7 hole 1 paste-2539.97 mask-1.7: 1(0,0)
  round 1.7 hole 1 paste-2539.97 mask-1.7: 2(0,-2.54)
  F.SilkS lines w0.254: -1.38,0 -1.38,1.38 0,1.38 ; -1.38,-3.92 1.38,-3.92 1.38,-1.27 -1.38,-1.27 -1.38,-3.92
  F.CrtYd lines w0.254: -1.77,-4.32 1.77,-4.32 1.77,1.77 -1.77,1.77 -1.77,-4.32
PinHeader_1x03_P2.54mm_Vertical [mm]
  rect 1.7x1.7 hole 1 paste-2539.97 mask-1.7: 1(0,0)
  round 1.7 hole 1 paste-2539.97 mask-1.7: 2(0,-2.54) 3(0,-5.08)
  F.SilkS lines w0.254: -1.38,0 -1.38,1.38 0,1.38 ; -1.38,-6.46 1.38,-6.46 1.38,-1.27 -1.38,-1.27 -1.38,-6.46
  F.CrtYd lines w0.254: -1.77,-6.85 1.77,-6.85 1.77,1.77 -1.77,1.77 -1.77,-6.85
R_0603_1608Metric [mm]
  rrect25% 0.8x0.95 smd paste-0.95 mask-0.95: 1(-0.825,0) 2(0.825,0)
  F.SilkS lines w0.254: -0.237,-0.523 0.237,-0.523 ; -0.237,0.523 0.237,0.523
  F.CrtYd lines w0.254: -1.48,-0.73 1.48,-0.73 1.48,0.73 -1.48,0.73 -1.48,-0.73
R_1206_3216Metric [mm]
  rrect22% 1.125x1.75 smd paste-1.75 mask-1.75: 1(-1.462,0) 2(1.462,0)
  F.SilkS lines w0.254: -0.727,-0.91 0.727,-0.91 ; -0.727,0.91 0.727,0.91
  F.CrtYd lines w0.254: -2.28,-1.13 2.28,-1.13 2.28,1.13 -2.28,1.13 -2.28,-1.13
SOIC-8-1EP_3.9x4.9mm_P1.27mm_EP2.41x3.3mm [mm]
  rrect25% 1.95x0.6 smd paste-1.95 mask-1.95: 1(-2.475,1.905) 2(-2.475,0.635) 3(-2.475,-0.635) 4(-2.475,-1.905) 5(2.475,-1.905) 6(2.475,-0.635) 7(2.475,0.635) 8(2.475,1.905)
  rect 2.41x3.3 smd paste-3.3 mask-3.3: 9(0,0)
  rrect25% 0.97x1.33 on Mid13 paste-1.33 mask-1.33: Un1(-0.6,0.825) Un2(-0.6,-0.825) Un3(0.6,0.825) Un4(0.6,-0.825)
  F.SilkS region: -2.6,2.47 -2.84,2.8 -2.36,2.8
  F.SilkS lines w0.254: -2.06,-2.465 -2.06,-2.56 2.06,-2.465 2.06,-2.56 ; -2.06,2.465 -2.06,2.56 2.06,2.56 2.06,2.465
  F.CrtYd lines w0.254: -3.7,-2.46 -3.7,2.46 -2.2,2.46 -2.2,2.7 2.2,2.7 2.2,2.46 3.7,2.46 3.7,-2.46 2.2,-2.46 2.2,-2.7 -2.2,-2.7 -2.2,-2.46 -3.7,-2.46
SOIC-8-1EP_3.9x4.9mm_P1.27mm_EP2.41x3.3mm_ThermalVias [mm]
  rrect25% 1.95x0.6 smd paste-1.95 mask-1.95: 1(-2.475,1.905) 2(-2.475,0.635) 3(-2.475,-0.635) 4(-2.475,-1.905) 5(2.475,-1.905) 6(2.475,-0.635) 7(2.475,0.635) 8(2.475,1.905)
  round 0.5 hole 0.2 paste-2539.97 mask-0.5: 9(-0.7,-1.2) 9(-0.7,0) 9(-0.7,1.2) 9(0.7,-1.2) 9(0.7,0) 9(0.7,1.2)
  rect 2.41x3.3 smd paste-3.3 mask-3.3: 9(0,0)
  rect 1.9x2.9 on Mid2 paste-2.9 mask-2.9: 9(0,0)
  rrect25% 1.01x1.38 on Mid13 paste-1.38 mask-1.38: Un1(-0.6,0.825) Un2(-0.6,-0.825) Un3(0.6,0.825) Un4(0.6,-0.825)
  F.SilkS region: -2.6,2.47 -2.84,2.8 -2.36,2.8
  F.SilkS lines w0.254: -2.06,-2.465 -2.06,-2.56 2.06,-2.465 2.06,-2.56 ; -2.06,2.465 -2.06,2.56 2.06,2.56 2.06,2.465
  F.CrtYd lines w0.254: -3.7,-2.46 -3.7,2.46 -2.2,2.46 -2.2,2.7 2.2,2.7 2.2,2.46 3.7,2.46 3.7,-2.46 2.2,-2.46 2.2,-2.7 -2.2,-2.7 -2.2,-2.46 -3.7,-2.46
SolderJumper-2_P1.3mm_Open_TrianglePad1.0x1.5mm [mm]
  rect 0.3x0.3 smd paste-0.3 mask-0.3: 1(-0.725,0) 2(0.725,0)
  F.Cu region: 1.225,-0.75 0.075,-0.75 0.575,0 0.075,0.75 1.225,0.75
  F.Cu region: 0.275,0 -0.225,-0.75 -1.225,-0.75 -1.225,0.75 -0.225,0.75
  F.Mask region: 1.225,-0.75 0.075,-0.75 0.575,0 0.075,0.75 1.225,0.75
  F.Mask region: 0.275,0 -0.225,-0.75 -1.225,-0.75 -1.225,0.75 -0.225,0.75
  F.Mask lines w0.254: -1.225,-0.75 1.225,-0.75 1.225,0.75 -1.225,0.75 -1.225,-0.75
  F.SilkS lines w0.254: -1.4,-1 1.4,-1 1.4,1 -1.4,1 -1.4,-1
  F.CrtYd lines w0.254: -1.65,-1.25 1.65,-1.25 1.65,1.25 -1.65,1.25 -1.65,-1.25
SOT-23-5 [mm]
  rrect25% 1.325x0.6 smd paste-1.325 mask-1.325: 1(-1.138,0.95) 2(-1.138,0) 3(-1.138,-0.95) 4(1.138,-0.95) 5(1.138,0.95)
  F.SilkS region: -1.45,1.51 -1.69,1.84 -1.21,1.84
  F.SilkS lines w0.254: -0.91,-1.51 -0.91,-1.56 0.91,-1.51 0.91,-1.56 ; -0.91,1.51 -0.91,1.56 0.91,1.56 0.91,1.51 ; 0.91,-0.39 0.91,0.39
  F.CrtYd lines w0.254: -2.05,-1.5 -2.05,1.5 -1.05,1.5 -1.05,1.7 1.05,1.7 1.05,1.5 2.05,1.5 2.05,0.39 1.05,0.39 1.05,-0.39 2.05,-0.39 2.05,-1.5 1.05,-1.5 1.05,-1.7 -1.05,-1.7 -1.05,-1.5 -2.05,-1.5
SOT-23-6 [mm]
  rrect25% 1.325x0.6 smd paste-1.325 mask-1.325: 1(-1.138,0.95) 2(-1.138,0) 3(-1.138,-0.95) 4(1.138,-0.95) 5(1.138,0) 6(1.138,0.95)
  F.SilkS region: -1.45,1.51 -1.69,1.84 -1.21,1.84
  F.SilkS lines w0.254: -0.91,-1.51 -0.91,-1.56 0.91,-1.51 0.91,-1.56 ; -0.91,1.51 -0.91,1.56 0.91,1.56 0.91,1.51
  F.CrtYd lines w0.254: -2.05,-1.5 -2.05,1.5 -1.05,1.5 -1.05,1.7 1.05,1.7 1.05,1.5 2.05,1.5 2.05,-1.5 1.05,-1.5 1.05,-1.7 -1.05,-1.7 -1.05,-1.5 -2.05,-1.5
TestPoint_Loop_D2.50mm_Drill1.85mm [mm]
  round 3.4 hole 1.85 paste-2539.97 mask-3.4: 1(0,0)
  F.SilkS circle w0.254: c0,0 r1.9
  F.CrtYd circle w0.254: c0,0 r2.2
TO-252-2 [mm]
  rrect21% 2.2x1.2 smd paste-2.2 mask-2.2: 1(-5.04,2.28) 3(-5.04,-2.28)
  rrect4% 6.4x5.8 smd paste-6.4 mask-6.4: 2(1.26,0)
  rrect9% 3.05x2.75 on Mid13 paste-3.05 mask-3.05: Un1(-0.415,1.525) Un2(-0.415,-1.525) Un3(2.935,1.525) Un4(2.935,-1.525)
  F.SilkS region: -5.04,3.14 -5.38,3.61 -4.7,3.61
  F.SilkS lines w0.254: -3.31,-3.18 -3.31,-3.45 3.11,-3.45 ; -3.31,3.18 -3.31,3.45 3.11,3.45
  F.CrtYd lines w0.254: -6.39,-3.5 4.71,-3.5 4.71,3.5 -6.39,3.5 -6.39,-3.5

## Part data
C1 C2 C3 C4 C7: library part C_1206_3216Metric, "Capacitor SMD 1206 (3216 Metric), square (rectangular) end terminal, IPC-7351 nominal, (Body size source: IPC-SM-782 page 76, https://www.pcb-3d.com/wordpress/wp-content/uploads/ipc-sm-782a_amendment_1_and_2.pdf)", Description="Unpolarized capacitor", KiLib_Generator=SMD_2terminal_chip_molded, ki_fp_filters=C_*
C8 C11 C12 C13 C14 C15 C16: library part C_0603_1608Metric, "Capacitor SMD 0603 (1608 Metric), square (rectangular) end terminal, IPC-7351 nominal, (Body size source: IPC-SM-782 page 76, https://www.pcb-3d.com/wordpress/wp-content/uploads/ipc-sm-782a_amendment_1_and_2.pdf)", Description="Unpolarized capacitor", KiLib_Generator=SMD_2terminal_chip_molded, ki_fp_filters=C_*
C9 C10: library part C_0805_2012Metric, "Capacitor SMD 0805 (2012 Metric), square (rectangular) end terminal, IPC-7351 nominal, (Body size source: IPC-SM-782 page 76, https://www.pcb-3d.com/wordpress/wp-content/uploads/ipc-sm-782a_amendment_1_and_2.pdf, https://docs.google.com/spreadsheets/d/1BsfQQcO9C6DZCsRaXUlFlo91Tg2WpOkGARC1WS5S8t0/edit?usp=sharing)", Description="Unpolarized capacitor", KiLib_Generator=SMD_2terminal_chip_molded, ki_fp_filters=C_*
D1: library part Osram_BPW34S-SMD, "PhotoDiode, plastic SMD DIL, 4.5x4mm, area: 2.65x2.65mm, https://dammedia.osram.info/media/resource/hires/osram-dam-5488319/BPW%2034%20S_EN.pdf", LCSC Part=C145262, Datasheet=https://dammedia.osram.info/media/resource/hires/osram-dam-5488319/BPW%2034%20S_EN.pdf, Description="Silicon PIN Photodiode, Area 2.65x2.65mm", ki_fp_filters=Osram*BPW34S*
D6 D11 D16 D21 D22 D24: library part D_SMB, "Diode SMB (DO-214AA)", ki_fp_filters="TO-???* *_Diode_* *SingleDiode* D_*"
  D6 D11 D16 D21: Description=Diode, Sim.Device=D, Sim.Pins="1=K 2=A"
  D22: Description="Bidirectional transient-voltage-suppression diode"
  D24: Description="Schottky diode"
F1: library part Fuse_1206_3216Metric, "Fuse SMD 1206 (3216 Metric), square (rectangular) end terminal, IPC-7351 nominal, (Body size source: http://www.tortai-tech.com/upload/download/2011102023233369053.pdf)", Description=Fuse, KiLib_Generator=SMD_2terminal_chip_molded, ki_fp_filters=*Fuse*
H1 H2 H3 H4: library part MountingHole_2.2mm_M2, "Mounting Hole 2.2mm, M2, no annular, generated by kicad-footprint-generator mountinghole.py", Description="Mounting Hole without connection", KiLib_Generator=mounting_hardware/mounting_hole, ki_fp_filters=MountingHole*
J1: library part PinHeader_1x02_P2.54mm_Vertical, "Through hole straight pin header, 1x02, 2.54mm pitch, single row", Description="Generic connector, single row, 01x02, script generated (kicad-library-utils/schlib/autogen/connector/)", KiLib_Generator=connector/pin_header_socket, ki_fp_filters=Connector*:*_1x??_*
J2: library part PinHeader_1x03_P2.54mm_Vertical, "Through hole straight pin header, 1x03, 2.54mm pitch, single row", Description="Generic connector, single row, 01x03, script generated (kicad-library-utils/schlib/autogen/connector/)", KiLib_Generator=connector/pin_header_socket, ki_fp_filters=Connector*:*_1x??_*
J3 J4: library part HC-FPC-05-09-4RLTAG, "HCTL HC-FPC-05-09-4RLTAG, 0.5mm pitch, 4 circuits, dual-side (top and bottom) contacts, flip-lock (front insert, rear flip), horizontal SMT, 1.0mm height, 0.3mm FPC, LCSC C5213746. FPC opening faces -Y, pin 1 at -X; pads 5/6 = the two hold-downs.", LCSC=C5213746, Datasheet=https://atta.szlcsc.com/upload/public/pdf/source/20221026/52A26161A88FCE07A06989F8D4399614.pdf, Description="HCTL HC-FPC-05-09-4RLTAG, 0.5mm pitch, 4 circuits, dual-side (top and bottom) contacts, flip-lock (front insert, rear flip), horizontal SMT, 1.0mm height, 0.3mm FPC. Pins 5 and 6 are the two separate hold-down tabs. LCSC C5213746.", LCSC Part=C5213746, ki_fp_filters=HC-FPC-05-09-4RLTAG*
JP1 JP2 JP3 JP4: library part SolderJumper-2_P1.3mm_Open_TrianglePad1.0x1.5mm, "SMD Solder Jumper, 1x1.5mm Triangular Pads, 0.3mm gap, open", Description="Solder Jumper, 2-pole, open", ki_fp_filters=SolderJumper*Open*
L1 L2 L3 L4: library part L_1210_3225Metric, "Inductor SMD 1210 (3225 Metric), square (rectangular) end terminal, IPC-7351 nominal, (Body size source: http://www.tortai-tech.com/upload/download/2011102023233369053.pdf)", Description=Inductor, KiLib_Generator=SMD_2terminal_chip_molded, ki_fp_filters="Choke_* *Coil* Inductor_* L_*"
LED_B1 LED_B2 LED_B3 LED_B4: library part LED_3535_3500x3500mm, "3535 LED 3.5x3.5mm, 3 pads. Recommended soldering pattern per XINGLIGHT XL-HD3535SURC-A2 datasheet p.7: three 0.7/1.5/0.7 x 3.7 mm bars, 0.3 mm gap, pitch 1.4 mm. Middle pad is thermal (no net).", LCSC=C3646953, Description="Light emitting diode", Sim.Pins="1=K 2=A", LCSC Part=C3646953, ki_fp_filters="LED* LED_SMD:* LED_THT:*"
LED_G1 LED_G2 LED_G3 LED_G4: library part LED_3535_3500x3500mm, "3535 LED 3.5x3.5mm, 3 pads. Recommended soldering pattern per XINGLIGHT XL-HD3535SURC-A2 datasheet p.7: three 0.7/1.5/0.7 x 3.7 mm bars, 0.3 mm gap, pitch 1.4 mm. Middle pad is thermal (no net).", LCSC=C19185875, Description="Light emitting diode", Sim.Pins="1=K 2=A", LCSC Part=C19185875, ki_fp_filters="LED* LED_SMD:* LED_THT:*"
LED_IR1 LED_IR2 LED_IR3 LED_IR4: library part LED_3535_3500x3500mm, "3535 LED 3.5x3.5mm, 3 pads. Recommended soldering pattern per XINGLIGHT XL-HD3535SURC-A2 datasheet p.7: three 0.7/1.5/0.7 x 3.7 mm bars, 0.3 mm gap, pitch 1.4 mm. Middle pad is thermal (no net).", LCSC=C5221244, Description="Light emitting diode", Sim.Pins="1=K 2=A", LCSC Part=C5221244, ki_fp_filters="LED* LED_SMD:* LED_THT:*"
LED_R1 LED_R2 LED_R3 LED_R4: library part LED_3535_3500x3500mm, "3535 LED 3.5x3.5mm, 3 pads. Recommended soldering pattern per XINGLIGHT XL-HD3535SURC-A2 datasheet p.7: three 0.7/1.5/0.7 x 3.7 mm bars, 0.3 mm gap, pitch 1.4 mm. Middle pad is thermal (no net).", LCSC=C3646952, Description="Light emitting diode", Sim.Pins="1=K 2=A", LCSC Part=C3646952, ki_fp_filters="LED* LED_SMD:* LED_THT:*"
R1 R2 R3 R4: library part R_1206_3216Metric, "Resistor SMD 1206 (3216 Metric), square (rectangular) end terminal, IPC-7351 nominal, (Body size source: IPC-SM-782 page 72, https://www.pcb-3d.com/wordpress/wp-content/uploads/ipc-sm-782a_amendment_1_and_2.pdf)", Description=Resistor, KiLib_Generator=SMD_2terminal_chip_molded, ki_fp_filters=R_*
R6 R7 R8 R9 R10 R11: library part R_0603_1608Metric, "Resistor SMD 0603 (1608 Metric), square (rectangular) end terminal, IPC-7351 nominal, (Body size source: IPC-SM-782 page 72, https://www.pcb-3d.com/wordpress/wp-content/uploads/ipc-sm-782a_amendment_1_and_2.pdf)", Description=Resistor, KiLib_Generator=SMD_2terminal_chip_molded, ki_fp_filters=R_*
TP1 TP2 TP3 TP4 TP5 TP6: library part TestPoint_Loop_D2.50mm_Drill1.85mm, "wire loop as test point, loop diameter 2.5mm, hole diameter 1.85mm", Description="test point", ki_fp_filters="Pin* Test*"
U1: library part SOT-23-6, "SOT, 6 Pin (JEDEC MO-178 Var AB https://www.jedec.org/document_search?search_api_views_fulltext=MO-178)", Datasheet=http://www.ti.com/lit/ds/symlink/ads1110.pdf, Description="16 Bit Analog to Digital converter with on board reference", KiLib_Generator=package/gullwing, ki_fp_filters=SOT?23*
U2: library part SOT-23-5, "SOT, 5 Pin (JEDEC MO-178 Var AA https://www.jedec.org/document_search?search_api_views_fulltext=MO-178)", Datasheet=http://www.ti.com/lit/ds/symlink/opa333.pdf, Description="Single 1.8V, microPower, CMOS Operational Amplifiers, Zero-Drift Series, SOT-23-5", KiLib_Generator=package/gullwing, ki_fp_filters=SOT?23*
U3: library part MSOP-10_3x3mm_P0.5mm, "MSOP, 10 Pin (JEDEC MO-187 variation BA, 0.85mm body thickness, https://www.jedec.org/system/files/docs/mo-187F.pdf)", Datasheet=http://ww1.microchip.com/downloads/en/DeviceDoc/22187E.pdf, Description="12-bit digital to analog converter, quad output, 2.048V internal reference, integrated EEPROM, I2C interface", KiLib_Generator=package/gullwing, ki_fp_filters=*SOP*3x3mm*P0.5mm*
U4: library part SOIC-8-1EP_3.9x4.9mm_P1.27mm_EP2.41x3.3mm_ThermalVias, "SOIC, 8 Pin (http://www.allegromicro.com/~/media/Files/Datasheets/A4950-Datasheet.ashx#page=8)", LCSC Part=C526360, MPN=AL8862SP-13, Manufacturer=DIODES(美台), Package=SO-8_L4.9-W3.9-P1.27-LS6.0-BL-EP, Datasheet=https://www.diodes.com/assets/Datasheets/AL8862.pdf, Description="60V 1A step-down (hysteretic buck) LED driver, PWM/analog dimming via CTRL, SO-8EP", KiLib_Generator=package/gullwing
U5 U6 U7: library part SOIC-8-1EP_3.9x4.9mm_P1.27mm_EP2.41x3.3mm, "SOIC, 8 Pin (http://www.allegromicro.com/~/media/Files/Datasheets/A4950-Datasheet.ashx#page=8)", LCSC Part=C526360, MPN=AL8862SP-13, Manufacturer=DIODES(美台), Package=SO-8_L4.9-W3.9-P1.27-LS6.0-BL-EP, Datasheet=https://www.diodes.com/assets/Datasheets/AL8862.pdf, Description="60V 1A step-down (hysteretic buck) LED driver, PWM/analog dimming via CTRL, SO-8EP", KiLib_Generator=package/gullwing
U10: library part TO-252-2, "TO-252/DPAK SMD package, http://www.infineon.com/cms/en/product/packages/PG-TO252/PG-TO252-3-1/", Datasheet=http://www.ti.com/lit/ds/snvs774n/snvs774n.pdf, Description="1.5A 35V Adjustable Linear Regulator, TO-252", KiLib_Generator=package/TO_SOT/SMD, ki_fp_filters=TO?252*

## Nets (pads, with @x,y where several pads share a name; then routed paths per layer and width w, separated by ;. In a path a pad name is that pad's centre, name@x,y a point inside that pad or via, vN(x,y) a via of type N, cw(c..) or ccw(c..) an arc to the next point about the centre after c; other vN are vias at no path point)
pads on no net: C1.1 C1.2 C2.1 C2.2 C3.1 C3.2 C4.1 C4.2 C7.1 C7.2 C8.1 C8.2 C9.1 C9.2 C10.1 C10.2 C11.1 C11.2 C12.1 C12.2 C13.1 C13.2 C14.1 C14.2 C15.1 C15.2 C16.1 C16.2 D1.1 D1.2 D1.Un1 D1.Un2 D1.Un3 D1.Un4 D6.1 D6.2 D11.1 D11.2 D16.1 D16.2 D21.1 D21.2 D22.1 D22.2 D24.1 D24.2 F1.1 F1.2 H1.Un1 H2.Un1 H3.Un1 H4.Un1 J1.1 J1.2 J2.1 J2.2 J2.3 J3.1 J3.2 J3.3 J3.4 J3.5 J3.6 J4.1 J4.2 J4.3 J4.4 J4.5 J4.6 JP1.1 JP1.2 JP2.1 JP2.2 JP3.1 JP3.2 JP4.1 JP4.2 L1.1 L1.2 L2.1 L2.2 L3.1 L3.2 L4.1 L4.2 LED_B1.1 LED_B1.2 LED_B1.Un1 LED_B2.1 LED_B2.2 LED_B2.Un1 LED_B3.1 LED_B3.2 LED_B3.Un1 LED_B4.1 LED_B4.2 LED_B4.Un1 LED_G1.1 LED_G1.2 LED_G1.Un1 LED_G2.1 LED_G2.2 LED_G2.Un1 LED_G3.1 LED_G3.2 LED_G3.Un1 LED_G4.1 LED_G4.2 LED_G4.Un1 LED_IR1.1 LED_IR1.2 LED_IR1.Un1 LED_IR2.1 LED_IR2.2 LED_IR2.Un1 LED_IR3.1 LED_IR3.2 LED_IR3.Un1 LED_IR4.1 LED_IR4.2 LED_IR4.Un1 LED_R1.1 LED_R1.2 LED_R1.Un1 LED_R2.1 LED_R2.2 LED_R2.Un1 LED_R3.1 LED_R3.2 LED_R3.Un1 LED_R4.1 LED_R4.2 LED_R4.Un1 R1.1 R1.2 R2.1 R2.2 R3.1 R3.2 R4.1 R4.2 R6.1 R6.2 R7.1 R7.2 R8.1 R8.2 R9.1 R9.2 R10.1 R10.2 R11.1 R11.2 TP1.1 TP2.1 TP3.1 TP4.1 TP5.1 TP6.1 U1.1 U1.2 U1.3 U1.4 U1.5 U1.6 U2.1 U2.2 U2.3 U2.4 U2.5 U3.1 U3.2 U3.3 U3.4 U3.5 U3.6 U3.7 U3.8 U3.9 U3.10 U4.1 U4.2 U4.3 U4.4 U4.5 U4.6 U4.7 U4.8 U4.9 U4.Un1 U4.Un2 U4.Un3 U4.Un4 U5.1 U5.2 U5.3 U5.4 U5.5 U5.6 U5.7 U5.8 U5.9 U5.Un1 U5.Un2 U5.Un3 U5.Un4 U6.1 U6.2 U6.3 U6.4 U6.5 U6.6 U6.7 U6.8 U6.9 U6.Un1 U6.Un2 U6.Un3 U6.Un4 U7.1 U7.2 U7.3 U7.4 U7.5 U7.6 U7.7 U7.8 U7.9 U7.Un1 U7.Un2 U7.Un3 U7.Un4 U10.1 U10.2 U10.3 U10.Un1 U10.Un2 U10.Un3 U10.Un4
copper on no net: | length 320
  Edge.Cuts w0.254: 100,3.85 100,33.85 110,33.85 110,3.85 100,3.85 ; 112,3.85 112,33.85 202,33.85 202,3.85 112,3.85

## Silkscreen, mask and mechanical layers (free items; w line width, h text height)
User.2:
  lines w0.254: 130.5,7.85 134,7.85 134,11.35 130.5,11.35 130.5,7.85 ; 130.5,11.85 134,11.85 134,15.35 130.5,15.35 130.5,11.85 ; 130.5,22.35 134,22.35 134,25.85 130.5,25.85 130.5,22.35 ; 130.5,26.35 134,26.35 134,29.85 130.5,29.85 130.5,26.35 ; 134.5,7.85 138,7.85 138,11.35 134.5,11.35 134.5,7.85 ; 134.5,11.85 138,11.85 138,15.35 134.5,15.35 134.5,11.85 ; 134.5,22.35 138,22.35 138,25.85 134.5,25.85 134.5,22.35 ; 134.5,26.35 138,26.35 138,29.85 134.5,29.85 134.5,26.35 ; 176,7.85 179.5,7.85 179.5,11.35 176,11.35 176,7.85 ; 176,11.85 179.5,11.85 179.5,15.35 176,15.35 176,11.85 ; 176,22.35 179.5,22.35 179.5,25.85 176,25.85 176,22.35 ; 176,26.35 179.5,26.35 179.5,29.85 176,29.85 176,26.35 ; 180,7.85 183.5,7.85 183.5,11.35 180,11.35 180,7.85 ; 180,11.85 183.5,11.85 183.5,15.35 180,15.35 180,11.85 ; 180,22.35 183.5,22.35 183.5,25.85 180,25.85 180,22.35 ; 180,26.35 183.5,26.35 183.5,29.85 180,29.85 180,26.35
  text "两板背面皆不可摆放元件！" at 99.85,37.153 h1
  text "R" at 131.35,26.7 h1
  text "B" at 135.35,26.7 h1
  text "B" at 176.85,26.7 h1
  text "R" at 180.85,26.7 h1
  text "G" at 131.35,22.7 h1
  text "IR" at 135.35,22.7 h1
  text "IR" at 176.85,22.7 h1
  text "G" at 180.85,22.7 h1
  text "G" at 131.35,12.2 h1
  text "IR" at 135.35,12.2 h1
  text "IR" at 176.85,12.2 h1
  text "G" at 180.85,12.2 h1
  text "R" at 131.35,8.2 h1
  text "B" at 135.35,8.2 h1
  text "B" at 176.85,8.2 h1
  text "R" at 180.85,8.2 h1

## Dimensions
184,25.85 to 184,11.85 on User.4
202,3.35 to 112,3.85 on User.4
110,3.85 to 100,3.85 on User.4
202,3.85 to 202,33.85 on User.4
134.5,30.35 to 179.5,30.85 on User.4

## Text inside footprints (layer, text, board x,y; h text height)
J3: F.Fab "1" at 103.325,6.495 h0.8; F.SilkS "1" at 103.425,5.545 h0.8
J4: F.Fab "1" at 115.73,20.075 h0.8 r90; F.SilkS "1" at 114.78,19.975 h0.8 r90